# Altium PCB PCB1.PcbDoc
Units mm, origin at the board's own origin, x right, y up, seen from the top; angles counter-clockwise.
Board outline 59.17 x 88.09 mm, 2 copper layers (Top Layer, Bottom Layer); 7 components, 10 nets, 66 pads, 4 vias.
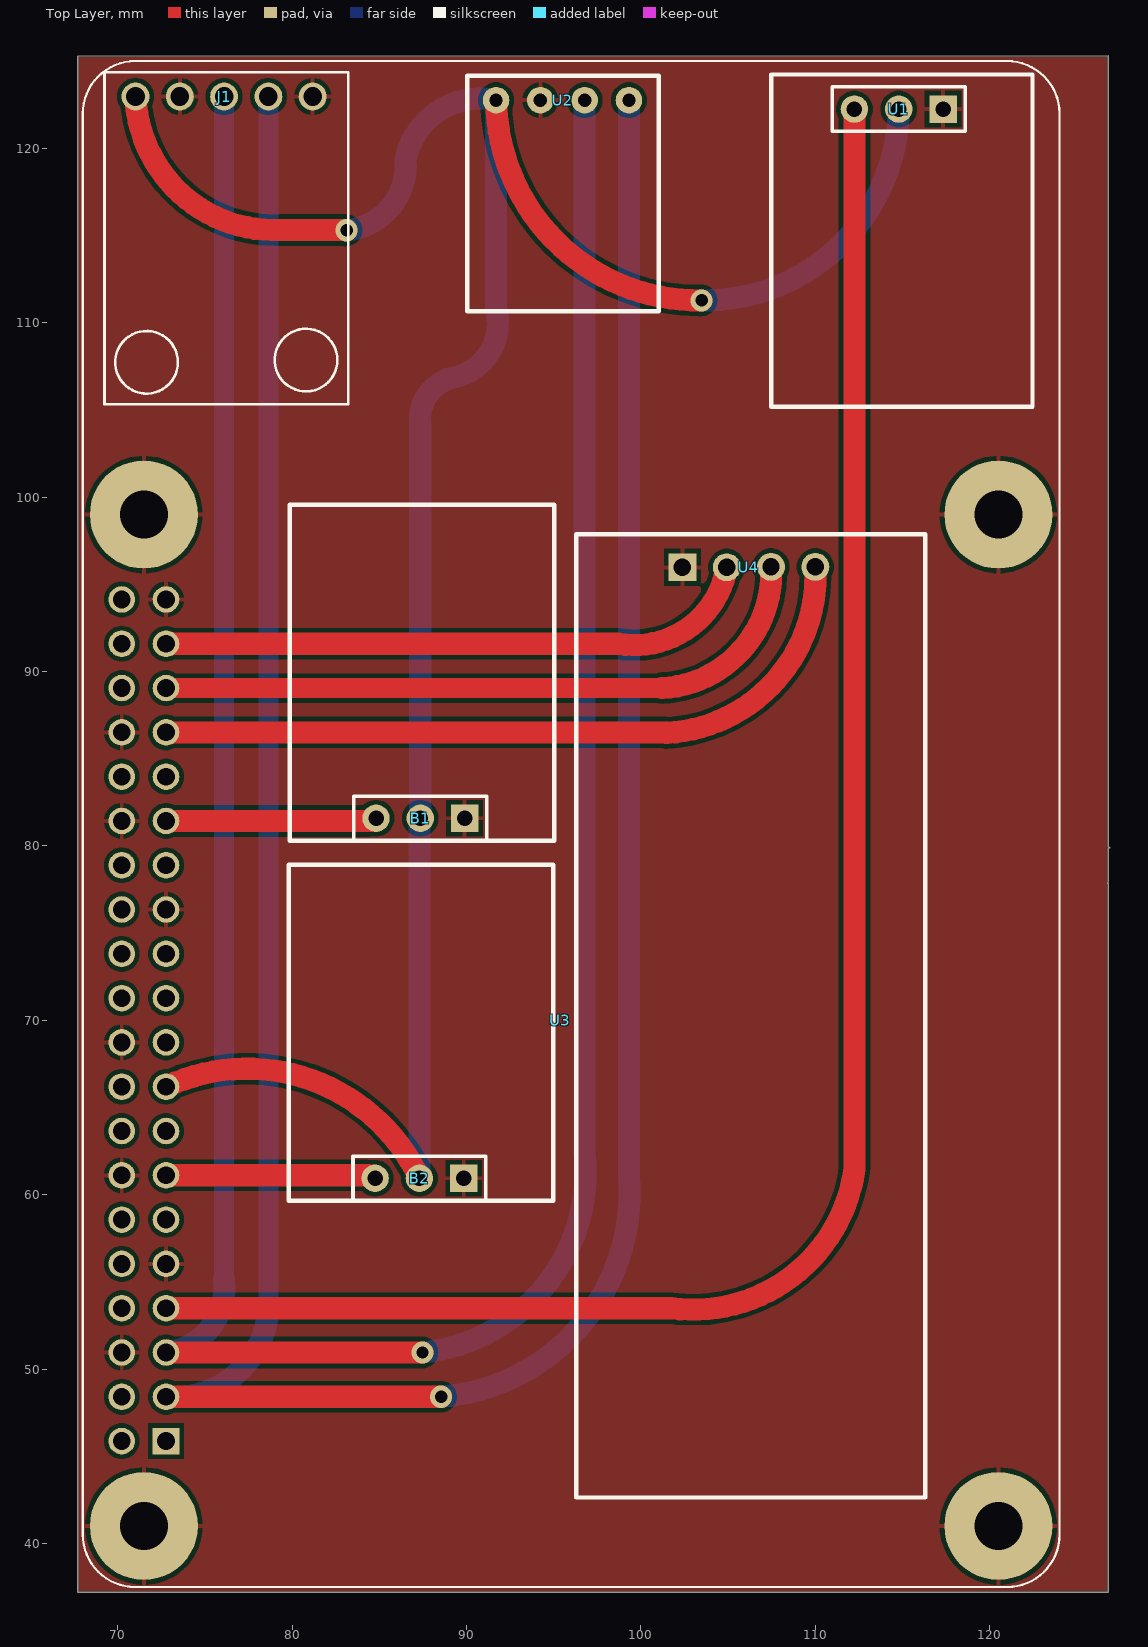
[diagram p0: Top Layer view]
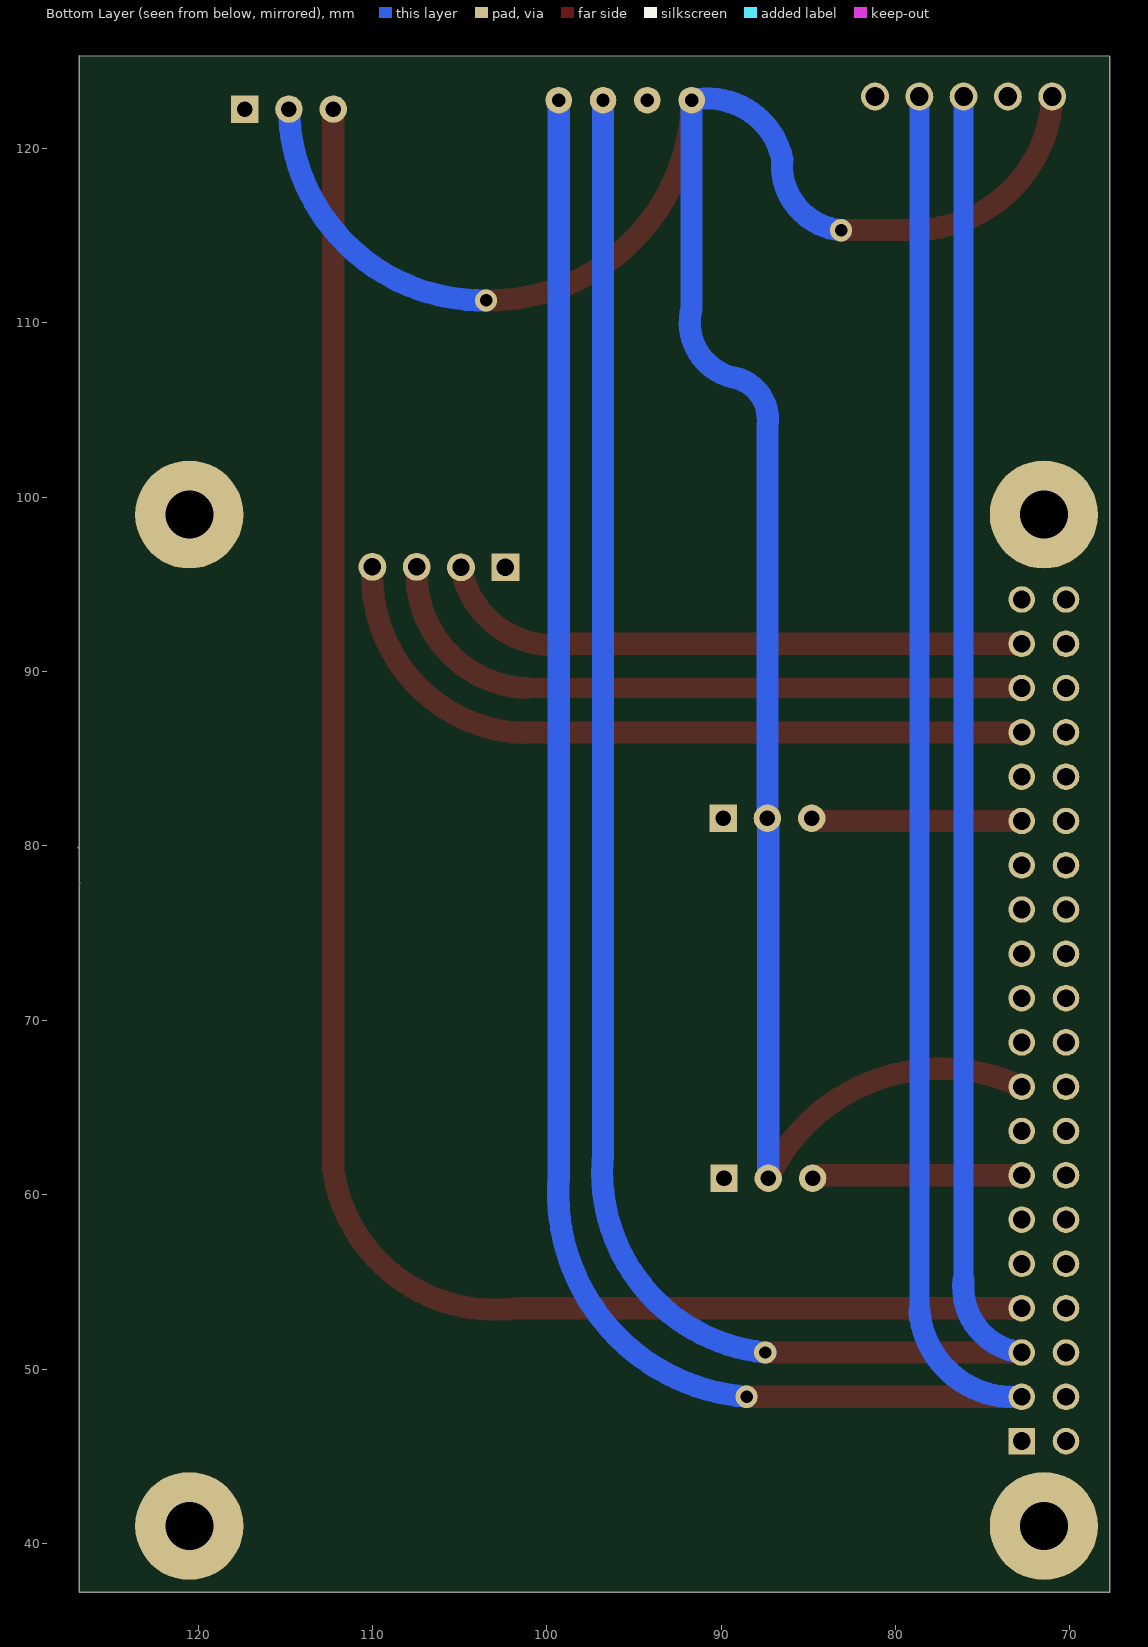
[diagram p1: Bottom Layer view, seen from below]
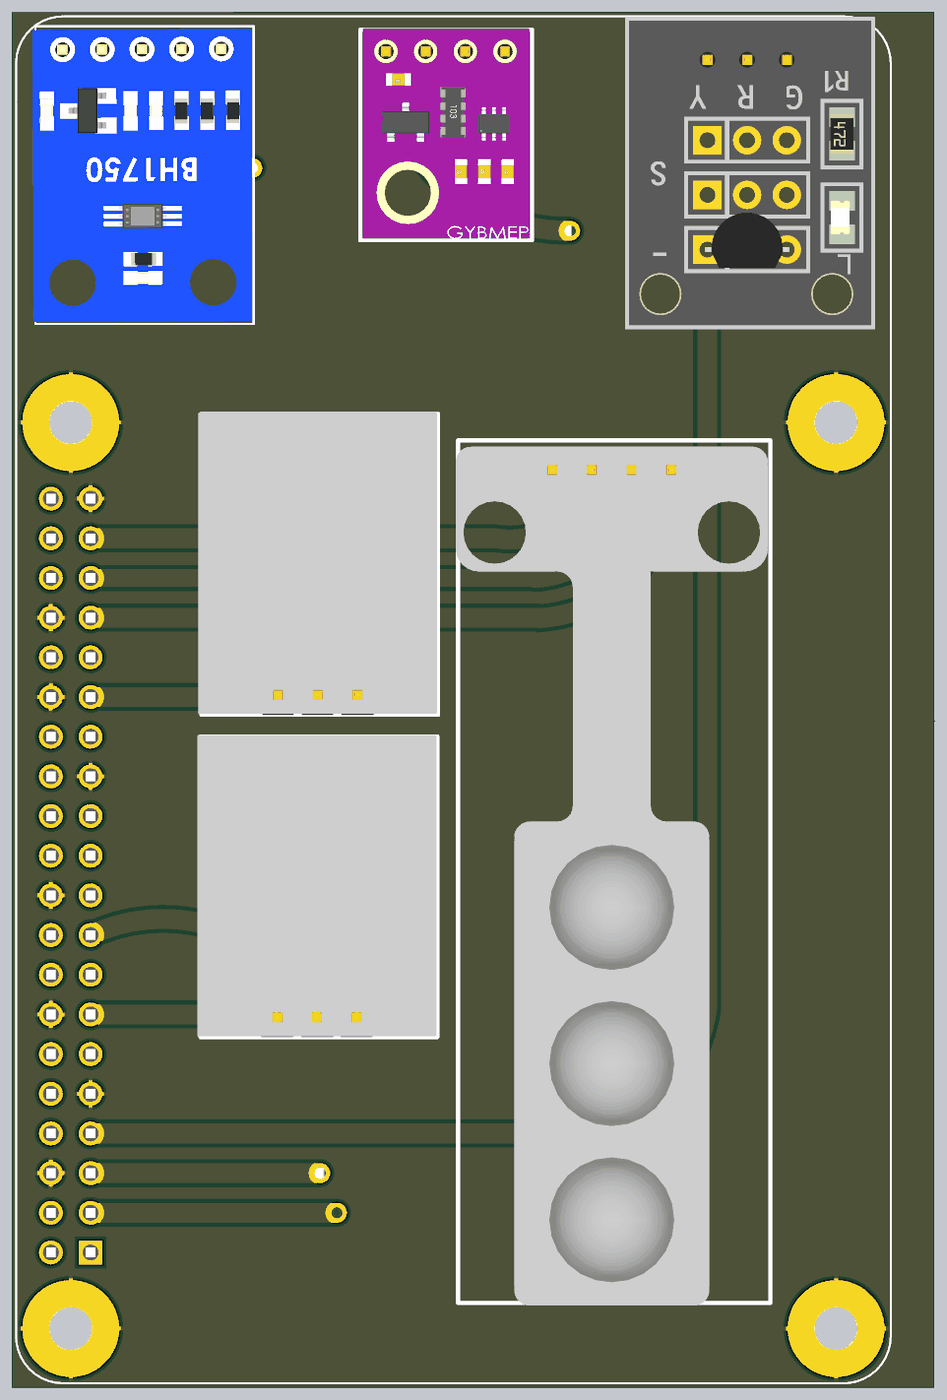
[diagram p2: 3D render of the assembled board from above, using the file's embedded part models]

## Layer stack, top to bottom
Top Solder: solder mask 0.0102, Solder Resist, Dk 3.5
Top Layer: signal copper 0.0356
Dielectric 1: dielectric 0.32, FR-4, Dk 4.8
Bottom Layer: signal copper 0.0356
Bottom Solder: solder mask 0.0102, Solder Resist, Dk 3.5

## Board outline
126.797,79.925 cw(c126.797,79.797) 126.888,79.887 126.797,79.85 126.797,77.925 126.775,77.878 ccw(c126.849,77.878) 126.797,77.825 126.797,37.211 67.716,37.211 67.716,125.273 126.797,125.298

## Design rules (kind name [scope] priority, off if disabled: settings)
AcuteAngle [All] p1: minimum=9.00000000000000E+0001 checktracksonly=FALSE
Clearance [All] p1: gap=0.254 ignorepadtopadclearanceinfootprint=FALSE
Height [All] p1: minheight=-5 maxheight=25.4 prefheight=12.7
HoleSize [All] p1: absolutevalues=TRUE maxlimit=3.5 minlimit=0.025 maxpercent=80.000 minpercent=20.000
PolygonConnect [All] p1: connectstyle=Relief reliefconductorwidth=0.254 reliefentries=4 polygonreliefangle="90 Angle" airgapwidth=0.254
RoutingVias [All] p1: holewidth=0.711 width=1.27 viastyle="Through Hole" minholewidth=0.711 minwidth=1.27 maxholewidth=0.711 maxwidth=1.27
SolderMaskExpansion [All] p1: expansion=0.102 istentingtop=FALSE
SupplyNets "Schematic Supply Nets_1" [InNet('GND')] p1: voltage=0.000
SupplyNets "Schematic Supply Nets" [InNet('VCC')] p2: voltage=0.000
Width [All] p1: maxlimit=1.27 minlimit=0.254 preferedwidth=1.016
28 further rules are at their usual default settings.

## Classes and differential pairs
component class Sheet1: B1 B2 J1 U1 U2 U4

## Components (designator, comment, footprint, x,y, rotation, side; value= is the part's Value field where it differs from the comment)
B1 "BT1" "Button KY-004" 89.561,85.085 r180 top
B2 "BT2" "Button KY-004" 89.51,64.44 r180 top
J1 "BH1750 module" BH1750 76.1,121.7 r0 top
U1 "DS18B20" DS18B20 114.605,109.524 r0 top
U2 "BME280" BME280 94.534,112.158 r0 top
U3 "Raspberry Pi 4 Module B" "RASPBERRY PI 4 MODULE B" 96,80 r90 top
U4 "LED" "Traffic LED" 106.14,95.987 r90 top

## Footprints (in the part's own frame and the unit in brackets; to place one, negate y for a bottom-side part, rotate by r counter-clockwise, add the part's x,y. Pads: shape width x height; smd on the part's side, far side on the other; paste and mask are expansions set on the pad)
BH1750 [mil]
  round 63 hole 42: ADDR(200,50) GND(-100,50) SCL(0,50) SDA(100,50) VCC(-200,50)
  silkscreen extent -270,-645 280,105, body extent -277,-640 277,98, height 351
BME280 [mil]
  round 60 hole 30: GND(-11.81,417.32) SCL(88.19,417.32) SDA(188.19,417.32) VCC(-111.81,417.32)
  silkscreen extent -177,-59 256,472, body extent -171,-56 250,476, height 331
"Button KY-004" [mil]
  rect 62x62 hole 35 paste-99999 mask+4: GND(-12.99,137.8)
  round 62 hole 35 paste-99999 mask+4: S(187.01,137.8) VCC(87.01,137.8)
  silkscreen extent -215,-570 382,189, body extent -213,-573 390,188, height 485
DS18B20 [mil]
  rect 62x62 hole 35 paste-99999 mask+4: GND(107.09,501.02)
  round 62 hole 35 paste-99999 mask+4: S(-92.91,501.02) VCC(7.09,501.02)
  silkscreen extent -281,-171 309,579, body extent -299,-179 331,608, height 657
"RASPBERRY PI 4 MODULE B" [mil]
  rect 60x60 / inner round 60 / far side rect 60x60 hole 40 mask+4.02: 1(-1343.7,914.57)
  round 60 hole 40 mask+4.02: 2(-1343.7,1014.57) 3(-1243.7,914.57) 4(-1243.7,1014.57) 5(-1143.7,914.57) 6(-1143.7,1014.57) 7(-1043.7,914.57) 8(-1043.7,1014.57) 9(-943.7,914.57) 10(-943.7,1014.57) 11(-843.7,914.57) 12(-843.7,1014.57) 13(-743.7,914.57) 14(-743.7,1014.57) 15(-643.7,914.57) 16(-643.7,1014.57) 17(-543.7,914.57) 18(-543.7,1014.57) 19(-443.7,914.57) 20(-443.7,1014.57) 21(-343.7,914.57) 22(-343.7,1014.57) 23(-243.7,914.57) 24(-243.7,1014.57) 25(-143.7,914.57) 26(-143.7,1014.57) 27(-43.7,914.57) 28(-43.7,1014.57) 29(56.3,914.57) 30(56.3,1014.57) 31(156.3,914.57) 32(156.3,1014.57) 33(256.3,914.57) 34(256.3,1014.57) 35(356.3,914.57) 36(356.3,1014.57) 37(456.3,914.57) 38(456.3,1014.57) 39(556.3,914.57) 40(556.3,1014.57)
  round 244.09 hole 108.27 mask+4.02: S1(-1535.43,964.57) S2(748.03,964.57) S3(748.03,-964.57) S4(-1535.43,-964.57)
  silkscreen extent -1673,-1102 1772,1102, body extent -1673,-1181 1783,1102
"Traffic LED" [mm]
  round 1.6 hole 1: G(0.013,-3.86) R(-0.013,1.22) Y(0.013,-1.32)
  rect 1.6x1.6 hole 1: GND(-0.013,3.76)
  silkscreen extent -53.35,-10.15 1.87,9.85, body extent -53.52,-10 1.48,10, height 20

## Part data
B1 B2: library part Button
J1: "1pc BH1750 Digital Ambient Light Intensity Sensor Module for Arduino GY-302", Package=None, Check_prices=https://www.snapeda.com/parts/ZC362800%23/YKS/view-part/?ref=eda, MF=YKS, MP=ZC362800#, SnapEDA_Link=https://www.snapeda.com/parts/ZC362800%23/YKS/view-part/?ref=snap
U1: Manufacturer Part=?, spicePre=U, Supplier=RS-Online, Supplier Part=540-2805, timeStamp=1464408497
U3: "The Raspberry Pi 4 Model B SC0194(9) single board computer features a Broadcom BCM2711 ARM Cortex-A72 quad-core processor operating at 1.5GHz, making it a powerful choice for embedded computing applications. Equipped with 4GB of RAM and a variety of conne", Package=None, Check_prices=https://www.snapeda.com/parts/SC0194(9)/Raspberry+Pi/view-part/?ref=eda, MF="Raspberry Pi", MP=SC0194(9), SnapEDA_Link=https://www.snapeda.com/parts/SC0194(9)/Raspberry+Pi/view-part/?ref=snap

## Via types
v1: diameter 1.27, hole 0.711, Top Layer to Bottom Layer, 4 vias

## Nets (pads, with @x,y where several pads share a name; then routed paths per layer and width w, separated by ;. In a path a pad name is that pad's centre, name@x,y a point inside that pad or via, vN(x,y) a via of type N, cw(c..) or ccw(c..) an arc to the next point about the centre after c; other vN are vias at no path point)
BT1: B1.S U3.29 | length 12.1
  Top Layer w1.27: U3.29 84.437,81.43 ccw(c84.437,81.959) B1.S
BT2: B2.S U3.13 | length 12
  Top Layer w1.27: U3.13 84.349,61.11 cw(c84.349,60.529) B2.S
DS18B20_DQ: U1.S U3.7 | length 104.4
  Top Layer w1.27: U3.7 101.725,53.49 ccw(c102.992,62.742) 112.245,61.475 U1.S
"G LED": U3.33 U4.G | length 42.9
  Top Layer w1.27: U3.33 101.476,86.51 cw(c101.476,86.476) 101.5,86.5 ; 101.476,86.476 ccw(c100.976,95.5) U4.G
GND: B1.GND B2.GND J1.ADDR J1.GND U1.GND U2.GND U3.6 U3.9 U3.14 U3.20 U3.25 U3.30 U3.34 U3.39 U3.S1 U3.S2 U3.S3 U3.S4 U4.GND
"R LED": U3.37 U4.R | length 34.4
  Top Layer w1.27: U3.37 98.7,91.59 ccw(c99.618,96.892) U4.R
SCL: J1.SCL U2.SCL U3.5 | length 165.2
  Top Layer w1.27: U3.5 v1(87.475,50.95) v1@87.478,50.952
  Bottom Layer w1.143: 76.1,55.1 J1.SCL
  Bottom Layer w1.27: U3.5 ccw(c72.36,54.69) 76.1,55.1 ; v1(87.475,50.95) ccw(c86.421,61.303) 96.774,62.357 U2.SCL
SDA: J1.SDA U2.SDA U3.3 | length 174.1
  Top Layer w1.27: U3.3 88.542,48.41 v1(88.544,48.412)
  Bottom Layer w1.143: 78.638,53.34 78.64,53.342 J1.SDA
  Bottom Layer w1.27: U3.3 ccw(c73.239,53.809) 78.638,53.34 ; v1(88.544,48.412) ccw(c87.63,60.096) 99.314,61.011 U2.SDA
VCC: B1.VCC B2.VCC J1.VCC U1.VCC U2.VCC U3.17 | length 145.9
  Top Layer w1.27: J1.VCC ccw(c78.999,123.295) 79.324,115.316 83.086,115.316 cw(c83.086,115.261) v1(83.125,115.3) ; U3.17 cw(c77.41,56.3) B2.VCC ; U2.VCC ccw(c103.327,122.911) v1(103.48,111.277)
  Bottom Layer w1.27: v1(83.125,115.3) ccw(c82.775,119.025) 86.5,119.375 cw(c90.789,118.47) U2.VCC 91.694,110.846 cw(c88.57,110.007) 89.408,106.883 ccw(c89.776,104.457) 87.351,104.089 B1.VCC ; B2.VCC B1.VCC@87.3,81.462 ; v1(103.48,111.277) ccw(c103.646,122.416) U1.VCC
"Y LED": U3.35 U4.Y | length 38.8
  Top Layer w1.143: U3.35 101.225,89.05
  Top Layer w1.27: 101.225,89.05 ccw(c100.868,95.643) U4.Y
pads on no net: U3.1 U3.2 U3.4 U3.8 U3.10 U3.11 U3.12 U3.15 U3.16 U3.18 U3.19 U3.21 U3.22 U3.23 U3.24 U3.26 U3.27 U3.28 U3.31 U3.32 U3.36 U3.38 U3.40

## Polygon pours and split planes (outlines as drawn)
GND on Top Layer "GND_L01_P001" (solid, pour order 1): 67.775,125.225 67.775,37.275 126.725,37.275 126.725,125.225